# Altium PCB POGO_LIQUID_TEST_V1.0.PcbDoc
Units mm, origin at the board's own origin, x right, y up, seen from the top; angles counter-clockwise.
Board outline 40 x 40 mm, 2 copper layers (Top Layer, Bottom Layer); 27 components, 13 nets, 63 pads, 7 vias.
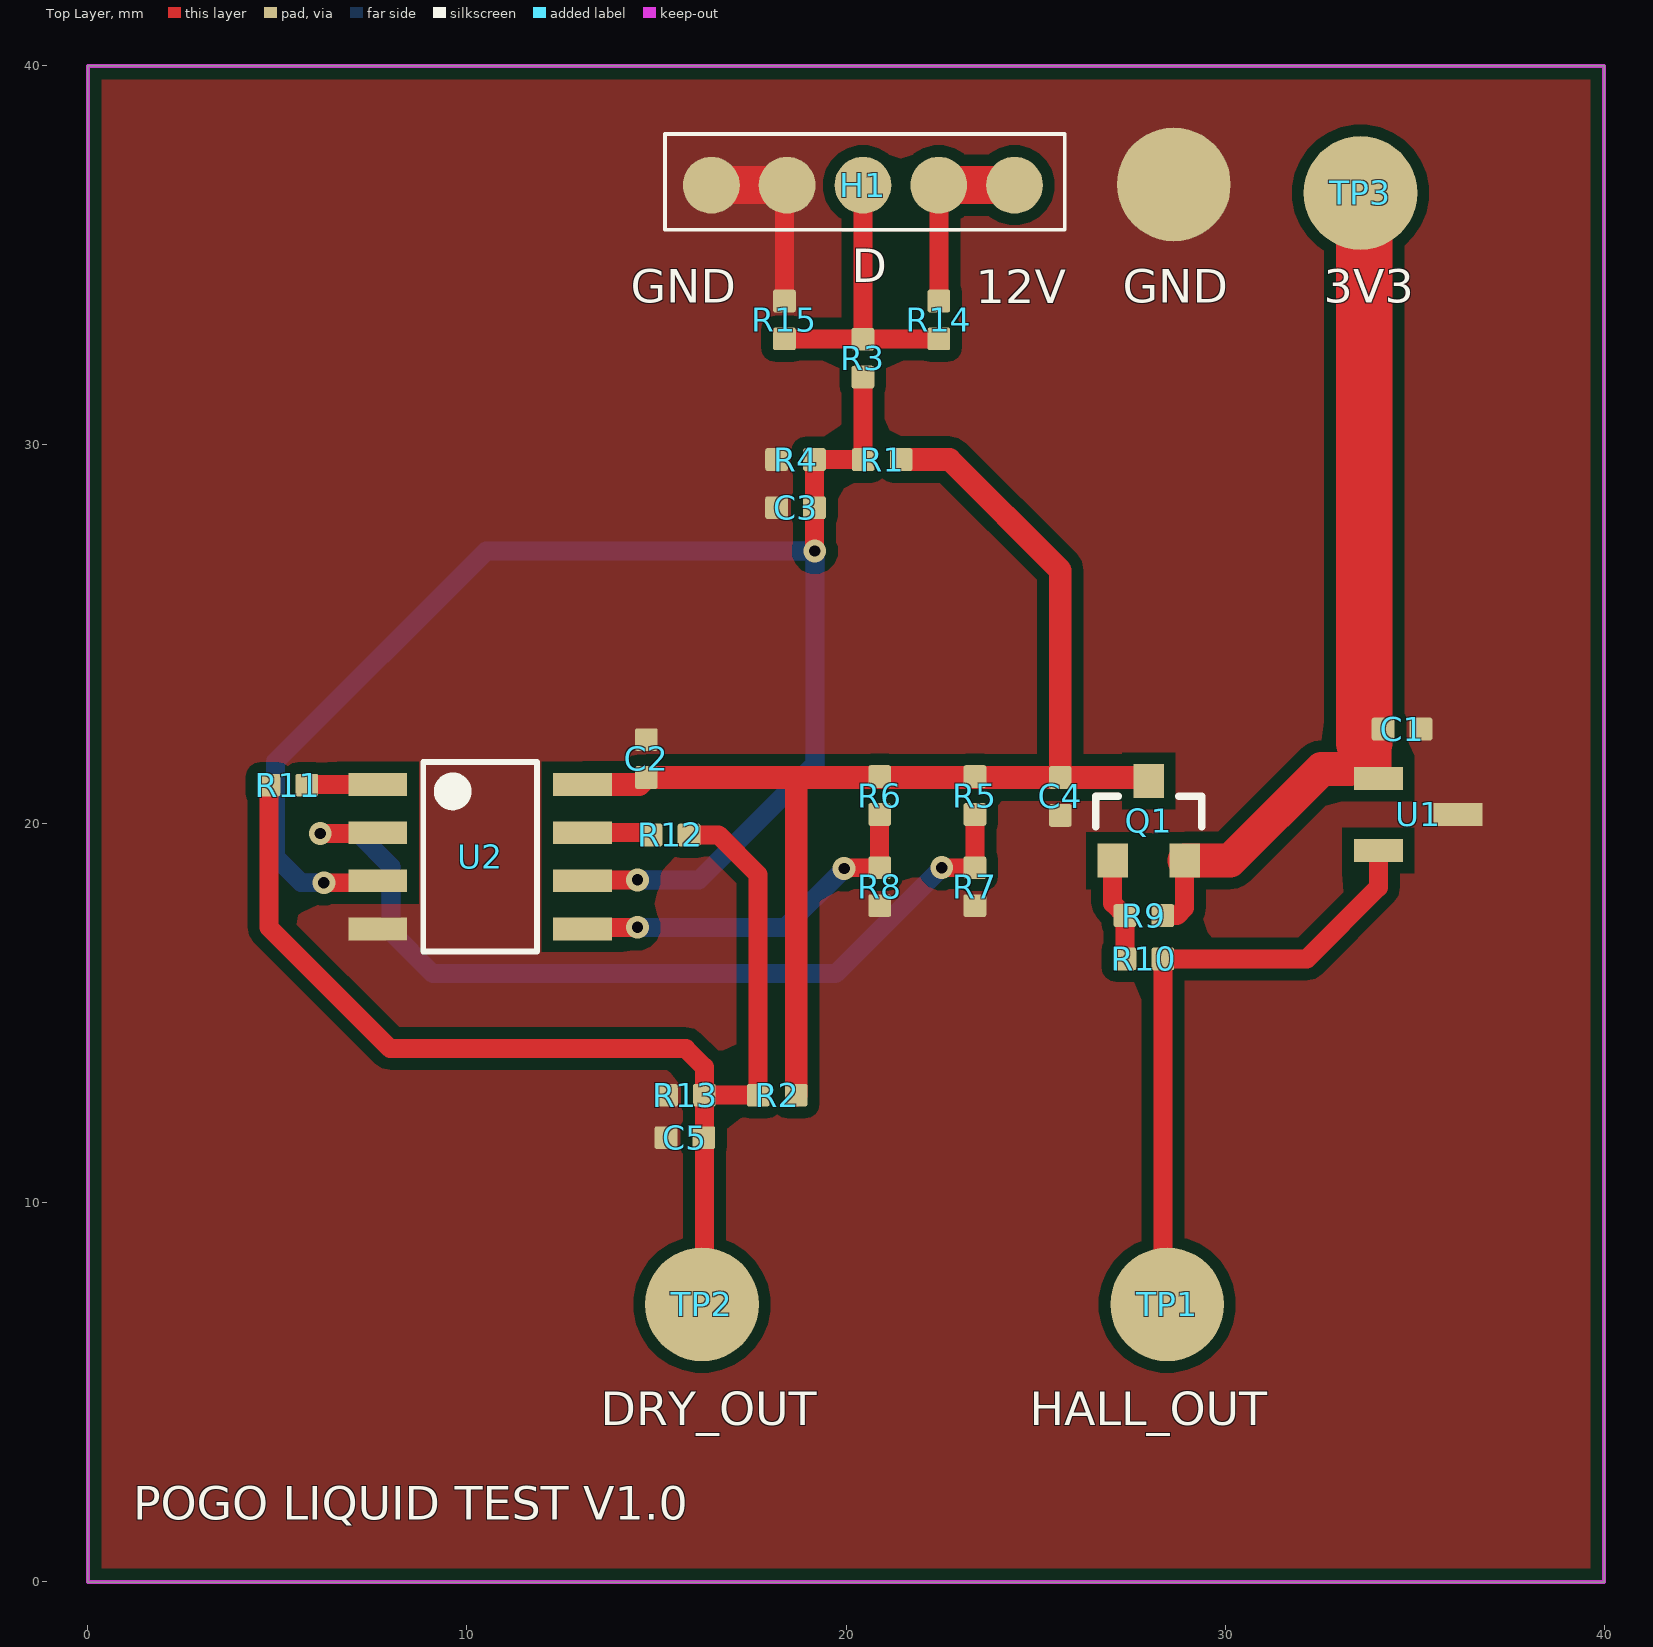
[diagram p0: Top Layer view]
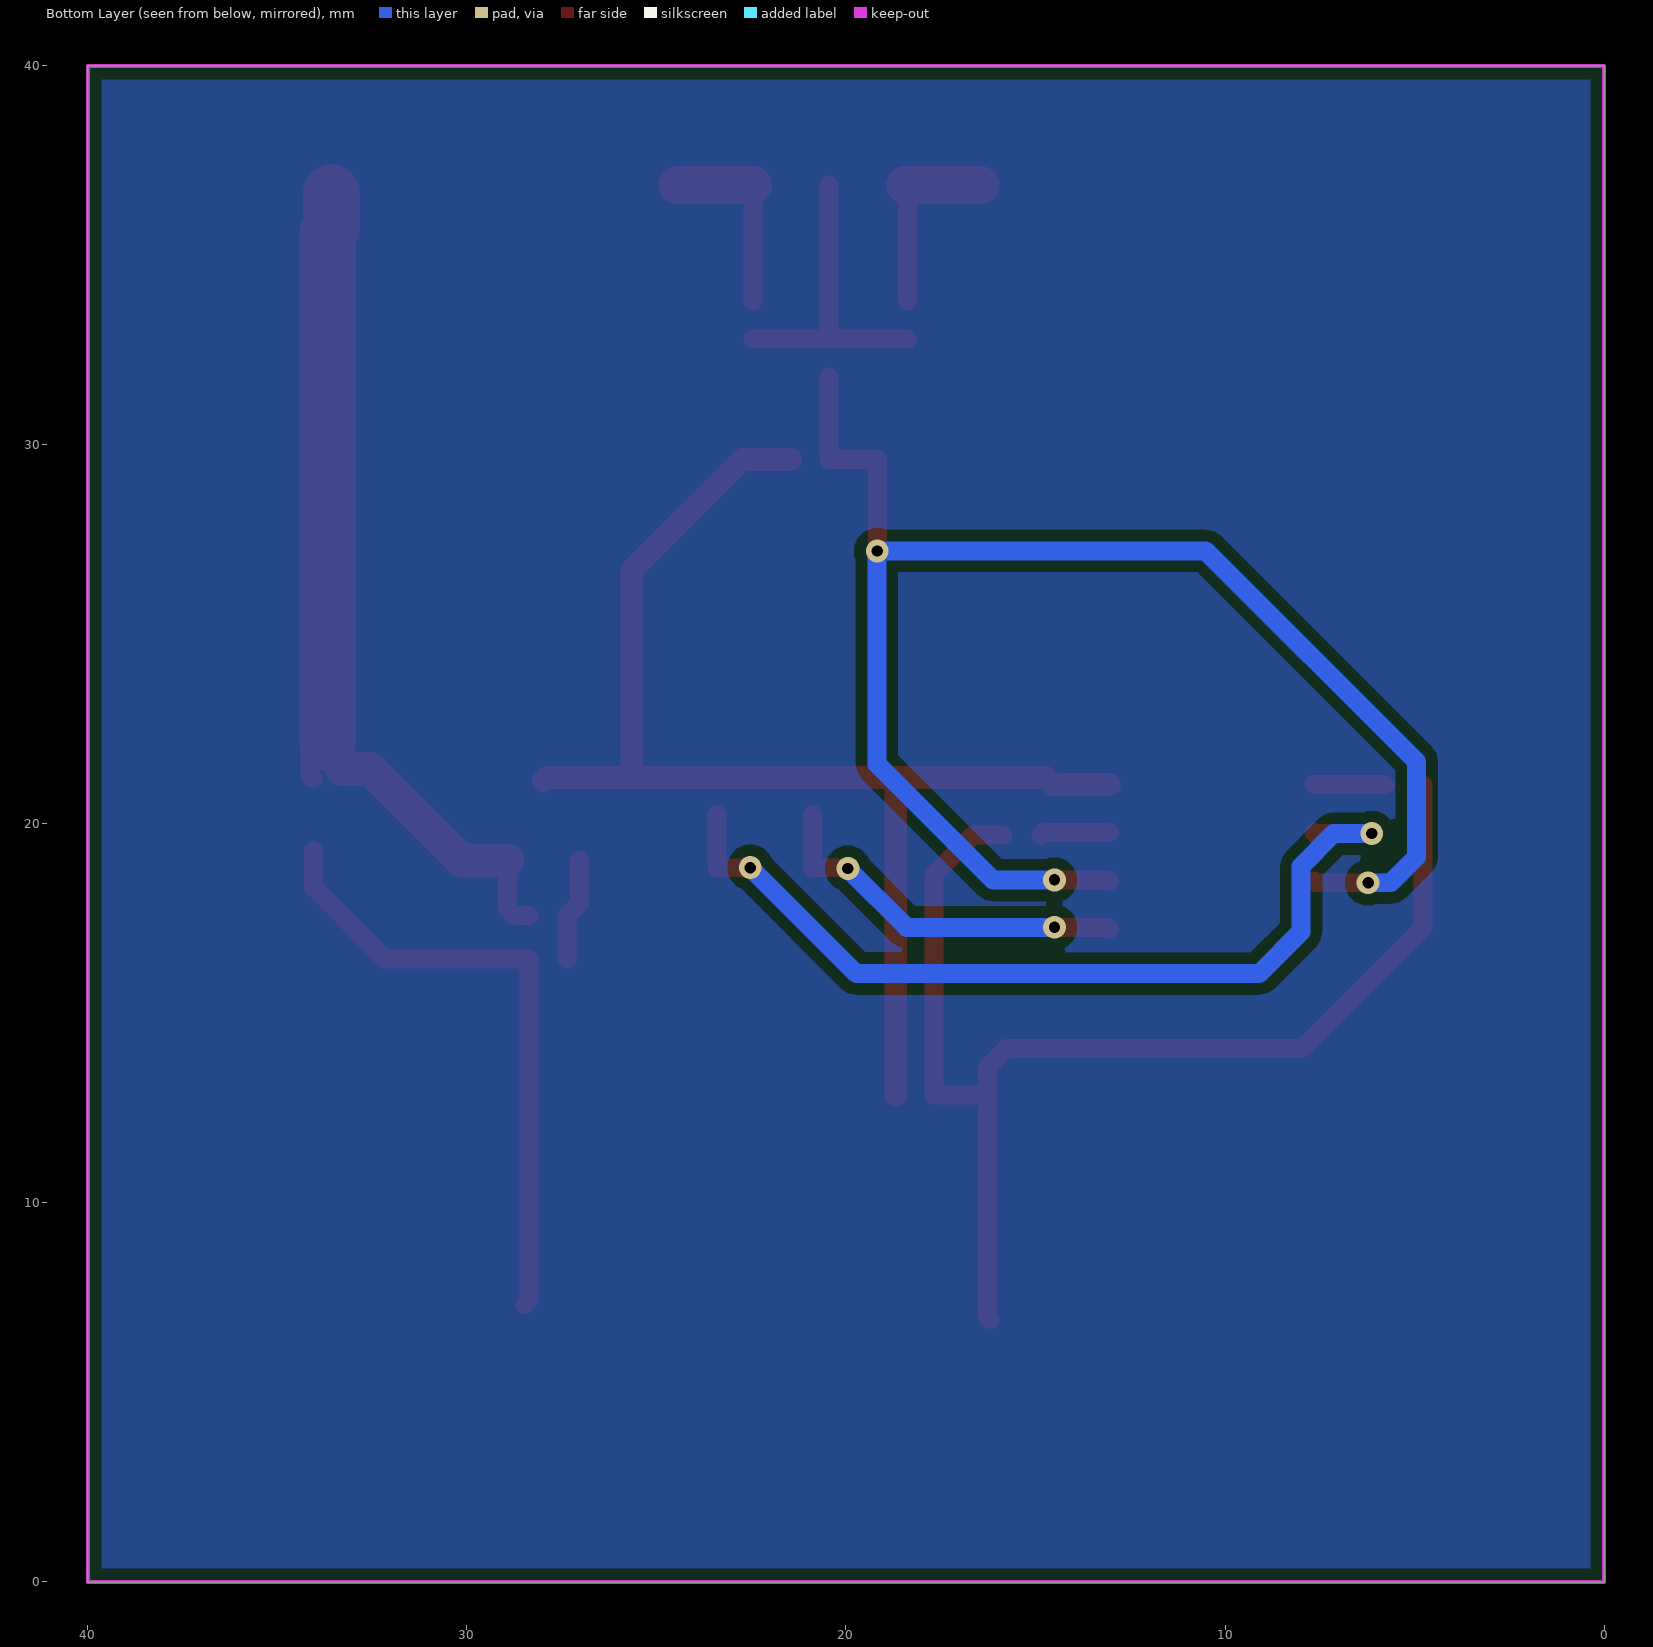
[diagram p1: Bottom Layer view, seen from below]
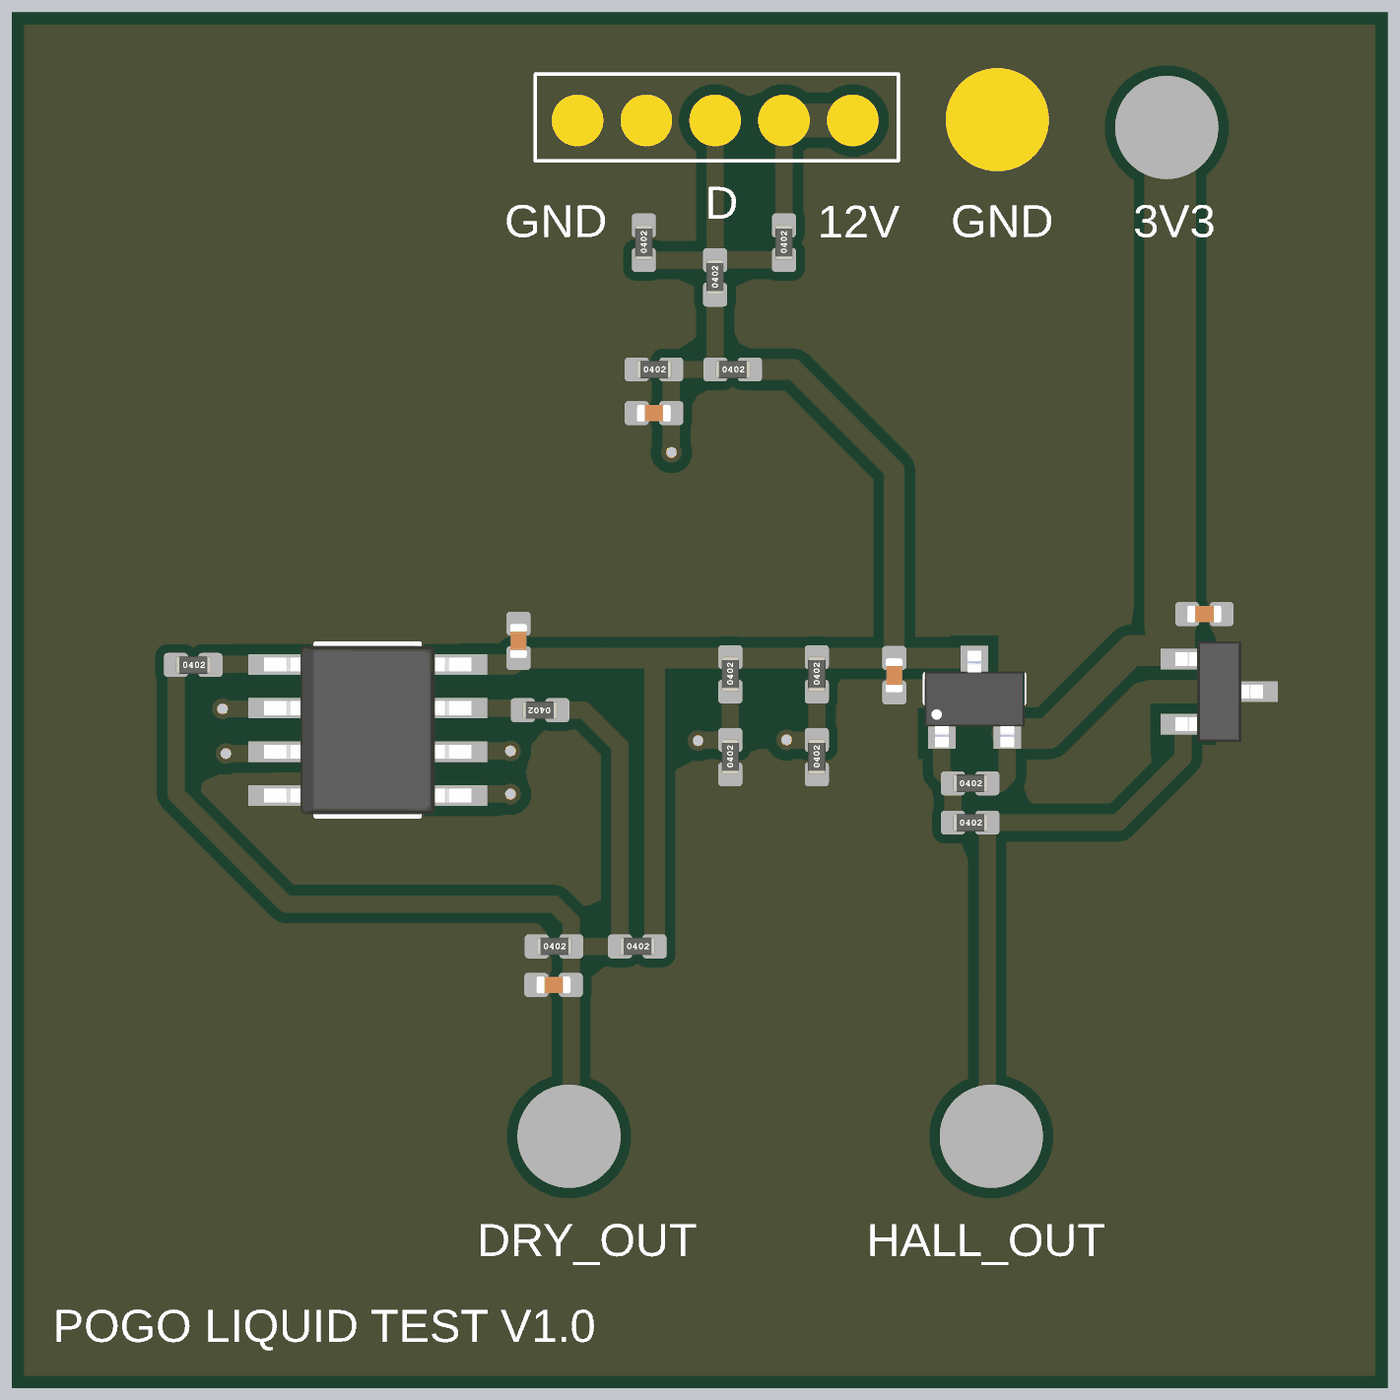
[diagram p2: 3D render of the assembled board from above, using the file's embedded part models]

## Layer stack, top to bottom
Top Solder: solder mask 0.0102, Solder Resist, Dk 3.5
Top Layer: signal copper 0.0356
Dielectric 1: dielectric 0.32, FR-4, Dk 4.8
Bottom Layer: signal copper 0.0356
Bottom Solder: solder mask 0.0102, Solder Resist, Dk 3.5

## Board outline
0,-0.025 0,39.975 40,39.975 40,-0.025

## Design rules (kind name [scope] priority, off if disabled: settings)
Clearance [All] p1: gap=0.15 ignorepadtopadclearanceinfootprint=FALSE except(0.3: Arc-Fill Arc-Poly Arc-Region Track-Fill Track-Poly Track-Region SMDPad-Fill SMDPad-Poly SMDPad-Region THPad-Fill THPad-Poly THPad-Region Via-Fill Via-Poly Via-Region Fill-Fill Fill-Poly Fill-Region Poly-Poly Poly-Region Region-Region)
PolygonConnect [All] p1: connectstyle=Direct reliefconductorwidth=0.254 reliefentries=4 polygonreliefangle="90 Angle" airgapwidth=0.254
RoutingVias [All] p1: holewidth=0.711 width=1.27 viastyle="Through Hole" minholewidth=0.711 minwidth=1.27 maxholewidth=0.711 maxwidth=1.27
SolderMaskExpansion [All] p1: expansion=0 istentingtop=FALSE
SupplyNets "Schematic Supply Nets_3" [InNet('3V3_TLV')] p1: voltage=0.000
SupplyNets "Schematic Supply Nets_2" [InNet('3V3')] p2: voltage=0.000
SupplyNets "Schematic Supply Nets_1" [InNet('+12')] p3: voltage=0.000
SupplyNets "Schematic Supply Nets" [InNet('GND')] p4: voltage=0.000
Width [All] p1: maxlimit=3 minlimit=0.254 preferedwidth=0.254
30 further rules are at their usual default settings.

## Components (designator, comment, footprint, x,y, rotation, side; value= is the part's Value field where it differs from the comment)
C1 "100nF" C0402L 34.671,22.479 r0 top
C2 "100nF" C0402L 14.732,21.701 r90 top
C3 "2.2nF" C0402L 18.669,28.321 r180 top
C4 "100nF" C0402L 25.654,20.701 r270 top
C5 "DNP" C0402L 15.75,11.7 r180 top
H1 "5xPOGO_PIN" "PAD POGOPIN" 20.447,36.83 r0 top
Q1 "AO3401A" SOT23-3 27.987,20.009 r270 top
R1 "1M" R0402L1 20.955,29.591 r0 top
R2 "10k" R0402L1 18.184,12.82 r0 top
R3 "1.5M" R0402L1 20.447,32.266 r90 top
R4 "330K" R0402L1 18.669,29.591 r0 top
R5 "330K" R0402L1 23.402,20.726 r90 top
R6 "267K" R0402L1 20.889,20.726 r90 top
R7 "100K" R0402L1 23.402,18.321 r90 top
R8 "100K" R0402L1 20.889,18.321 r90 top
R9 "1M" R0402L1 27.86,17.559 r0 top
R10 "10k" R0402L1 27.86,16.416 r0 top
R11 "0R" R0402L1 5.275,21 r0 top
R12 "0R" R0402L1 15.359,19.685 r180 top
R13 "100k" R0402L1 15.763,12.82 r0 top
R14 "DNP" R0402L1 22.45,33.275 r90 top
R15 "DNP" R0402L1 18.375,33.275 r90 top
TP1 "TP_?" TP_SMD_1P50 28.475,7.3 r90 top
TP2 "TP_?" TP_SMD_1P50 16.2,7.3 r90 top
TP3 "TP_?" TP_SMD_1P50 33.575,36.625 r90 top
U1 "DRV5032FADBZR" DBZ0003A-MFG 35.099,20.226 r0 top
U2 "TLV9022DR.A" D0008A-MFG 10.348,19.111 r0 top

## Footprints (in the part's own frame and the unit in brackets; to place one, negate y for a bottom-side part, rotate by r counter-clockwise, add the part's x,y. Pads: shape width x height; smd on the part's side, far side on the other; paste and mask are expansions set on the pad)
C0402L [mm]
  rrect20% 0.6x0.6 smd paste+0.05 mask+0.05: 1(-0.5,0) 2(0.5,0)
  body extent -0.5,-0.25 0.5,0.25, height 0.49
D0008A-MFG [mm]
  rect 1.55x0.6 smd paste+0 mask+0: 1(-2.7,1.905) 2(-2.7,0.635) 3(-2.7,-0.635) 4(-2.7,-1.905) 5(2.7,-1.905) 6(2.7,-0.635) 7(2.7,0.635) 8(2.7,1.905)
  silkscreen extent -1.5,-2.5 1.5,2.5, body extent -3.01,-2.45 3.01,2.45, height 1.63
DBZ0003A-MFG [mm]
  rect 1.3x0.6 smd paste+0 mask+0: 1(-1.05,0.95) 2(-1.05,-0.95) 3(1.05,0)
  body extent -1.27,-1.46 1.27,1.46, height 1
"PAD POGOPIN" [mm]
  round 1.5 smd paste-2539.97: 1(-4,0) 2(-2,0) 3(0,0) 4(2,0) 5(4,0)
  silkscreen extent -5.23,-1.17 5.33,1.35
R0402L1 [mm]
  rrect20% 0.6x0.6 smd paste+0.05 mask+0.05: 1(-0.5,0) 2(0.5,0)
  body extent -0.5,-0.25 0.52,0.25, height 0.51
SOT23-3 [mm]
  rect 0.9x0.8 smd: 1(1,-0.95) 2(1,0.95) 3(-1.1,0)
  silkscreen extent -0.7,-1.4 0.1,1.4, body extent -1.4,-1.45 1.4,1.45, height 1.25
TP_SMD_1P50 [mm] "Single 1.50 mm round top-layer copper test point for probing"
  round 3 smd: 1(0,0)

## Part data
C1 C2 C3 C4 C5: library part C0402, "CAP 0402 MLCC NON-POLARIZED GENERIC; VALUE TOLERANCE VOLTAGE AND MPN SET ON INSTANCE", Case=0402, Value2=SET_VOLTAGE, Package=0402, Type=Capacitor
  C1 C2 C4: Value1=100nF
  C3: Value1=2.2nF
  C5: Value1=DNP
Q1: "P-MOS SOT-23 Vds_-30V IdMax_-4A@TA25C AO3401A", JLCPCB Part #=C15127, Manufacturer="Alpha & Omega Semiconductor", Package=SOT-23, Check_prices=https://www.snapeda.com/parts/AO3401A/Alpha/view-part/?ref=eda, LCSC Part #=C15127, Manufacturer Part Number=AO3401A, MF="Alpha & Omega Semiconductor", MP=AO3401A, SnapEDA_Link=https://www.snapeda.com/parts/AO3401A/Alpha/view-part/?ref=snap
R1 R2 R3 R4 R5 R6 R7 R8 R9 R10 R11 R12 R13 R14 R15: library part R0402_4, "RES 0402 GENERIC; VALUE TOLERANCE POWER AND MPN SET ON INSTANCE", Case=0402, Value1=SET_VALUE, Package=0402, Type=Resistor
TP1 TP2 TP3: library part TEST_POINT, "TP SMD 1P PadDia_1.50mm ROUND COPPER TEST POINT"
U1: "Low-power (5Hz, <1ÂµA) low-voltage (up to 5.5V) switch 3-SOT-23 -40 to 85", Manufacturer_Name="Texas Instruments", Copyright="Copyright (C) 2026 Ultra Librarian. All rights reserved.", Manufacturer_Part_Number=DRV5032FADBZR, RefDes=RefDes, Type=TYPE
U2: "Dual precision comparator with open-drain output 8-SOIC -40 to 125"

## Free pads (board coordinates)
  round 3 smd paste-2539.97: 2(28.65,36.85)

## Via types
v1: diameter 0.6, hole 0.3, Top Layer to Bottom Layer, tented both sides, 7 vias

## Nets (pads, with @x,y where several pads share a name; then routed paths per layer and width w, separated by ;. In a path a pad name is that pad's centre, name@x,y a point inside that pad or via, vN(x,y) a via of type N, cw(c..) or ccw(c..) an arc to the next point about the centre after c; other vN are vias at no path point)
3V3: C1.1 Q1.2 R9.2 TP3.1 U1.1 | length 23.1
  Top Layer w0.5: R9.2 28.735,17.559 28.937,17.761 Q1.2 ; U1.1 34.143,21.27 C1.1@34.143,22.451
  Top Layer w0.9: Q1.2 30.134,19.009 32.55,21.425 33.3,21.425
  Top Layer w1.5: TP3.1 33.575,35.675 33.675,35.575 33.675,29.5 33.675,22.125
3V3_TLV: C2.1 C4.1 Q1.3 R1.2 R2.2 R5.2 R6.2 U2.8 | length 34.3
  Top Layer w0.6: U2.8 14.547,21.016 C2.1 18.675,21.201 ; R2.2 18.684,21.192 18.675,21.201 ; R1.2 22.733,29.591 25.654,26.67 C4.1 ; Q1.3 27.895,21.201 C4.1 ; 18.675,21.201 C4.1
+12: H1.4 H1.5 R14.2 | length 5.1
  Top Layer w0.5: H1.4 22.45,36.827 R14.2
  Top Layer w1: H1.4 H1.5
DRY_OUT: C5.1 R2.1 R11.1 R12.1 R13.2 TP2.1 | length 33
  Top Layer w0.5: R11.1 4.775,17.25 7.975,14.05 15.775,14.05 16.263,13.562 R13.2 ; R12.1 16.64,19.685 17.684,18.641 R2.1 R13.2 ; TP2.1@16.2,6.9 16.263,6.963 R13.2
GND: C1.2 C2.2 C3.2 C4.2 C5.2 H1.1 H1.2 pad.2 R4.1 R7.1 R8.1 R13.1 R15.2 U1.3 U2.4 | length 5.1
  Top Layer w0.5: R15.2 18.375,36.758 H1.2
  Top Layer w1: H1.1 H1.2
HALL_OUT: R10.2 TP1.1 U1.2 | length 16.6
  Top Layer w0.5: TP1.1 28.36,7.415 R10.2 32.164,16.416 34.049,18.301 U1.2
NetC3_1: C3.1 R1.1 R3.1 R4.2 U2.3 U2.6 | length 41
  Top Layer w0.5: v1(6.225,18.425) 7.597,18.425 U2.3 ; U2.6 13.072,18.5 v1(14.5,18.5) ; v1(19.177,27.178) 19.169,27.186 C3.1 R4.2 R1.1 20.447,29.599 R3.1
  Bottom Layer w0.5: v1(6.225,18.425) 5.625,18.425 4.95,19.1 4.95,21.625 10.503,27.178 v1(19.177,27.178) 19.177,21.552 16.125,18.5 v1(14.5,18.5)
NetH1_3: H1.3 R3.2 R14.1 R15.1 | length 8.1
  Top Layer w0.5: R15.1 18.384,32.766 R3.2 ; H1.3 R3.2 ; R14.1 20.456,32.775 R3.2
NetQ1_1: Q1.1 R9.1 R10.1 | length 2.7
  Top Layer w0.5: Q1.1 27.037,17.882 R9.1 R10.1
NetR11_2: R11.2 U2.1 | length 1.9
  Top Layer w0.5: R11.2 5.791,21.016 U2.1
NetR12_2: R12.2 U2.7 | length 1.8
  Top Layer w0.5: U2.7 14.798,19.746 R12.2
VH: R6.1 R8.2 U2.5 | length 9.9
  Top Layer w0.5: U2.5 13.092,17.25 v1(14.5,17.25) ; v1(19.95,18.8) 19.971,18.821 R8.2 ; R8.2@20.889,18.813 R6.1
  Bottom Layer w0.5: v1(14.5,17.25) 18.4,17.25 v1(19.95,18.8)
VL: R5.1 R7.2 U2.2 | length 23.9
  Top Layer w0.5: v1(6.125,19.725) 7.627,19.725 U2.2 ; v1(22.525,18.825) 22.529,18.821 R7.2 R5.1
  Bottom Layer w0.5: v1(6.125,19.725) 7.125,19.725 8,18.85 8,17.125 9.1,16.025 19.725,16.025 v1(22.525,18.825)

## Polygon pours and split planes (outlines as drawn)
GND on Bottom Layer "GND_L02_P003" (solid, pour order 3): 0,39.975 7.225,39.975 10.15,39.975 20.475,39.975 40,39.975 40,-0.025 0,-0.025
GND on Top Layer "GND_L01_P000" (solid, remove dead copper, pour order 0): 0,39.975 0,-0.024 0.001,-0.024 40.001,-0.024 40.001,39.976

## Keep-outs
Keep-Out Layer:
  the board outline again, w0.1

## Silkscreen, mask and mechanical layers (free items; w line width, h text height)
Top Overlay:
  text "D" at 20.15,33.975 h1.52
  text "GND" at 14.325,33.442 h1.52
  text "GND" at 27.3,33.442 h1.52
  text "3V3" at 32.6,33.442 h1.52
  text "12V" at 23.425,33.425 h1.52
  text "DRY_OUT" at 13.525,3.821 h1.52
  text "HALL_OUT" at 24.85,3.821 h1.52
  text "POGO LIQUID TEST V1.0" at 1.2,1.326 h1.52